# Altium PCB Thunderscope_Rev5.3.PcbDoc (part 11 of 14)
Units mil, origin at the board's own origin, x right, y up, seen from the top; angles counter-clockwise.
Board outline 3937.01 x 3838.58 mil, 6 copper layers (F.Cu, In1.Cu (GND), In2.Cu (Sign), In3.Cu (Sign), In4.Cu (GND), B.Cu), stack 60.556 mil thick; 911 components, 486 nets, 2834 pads, 2761 vias.
Unrouted connection lines stored in the file: 618.
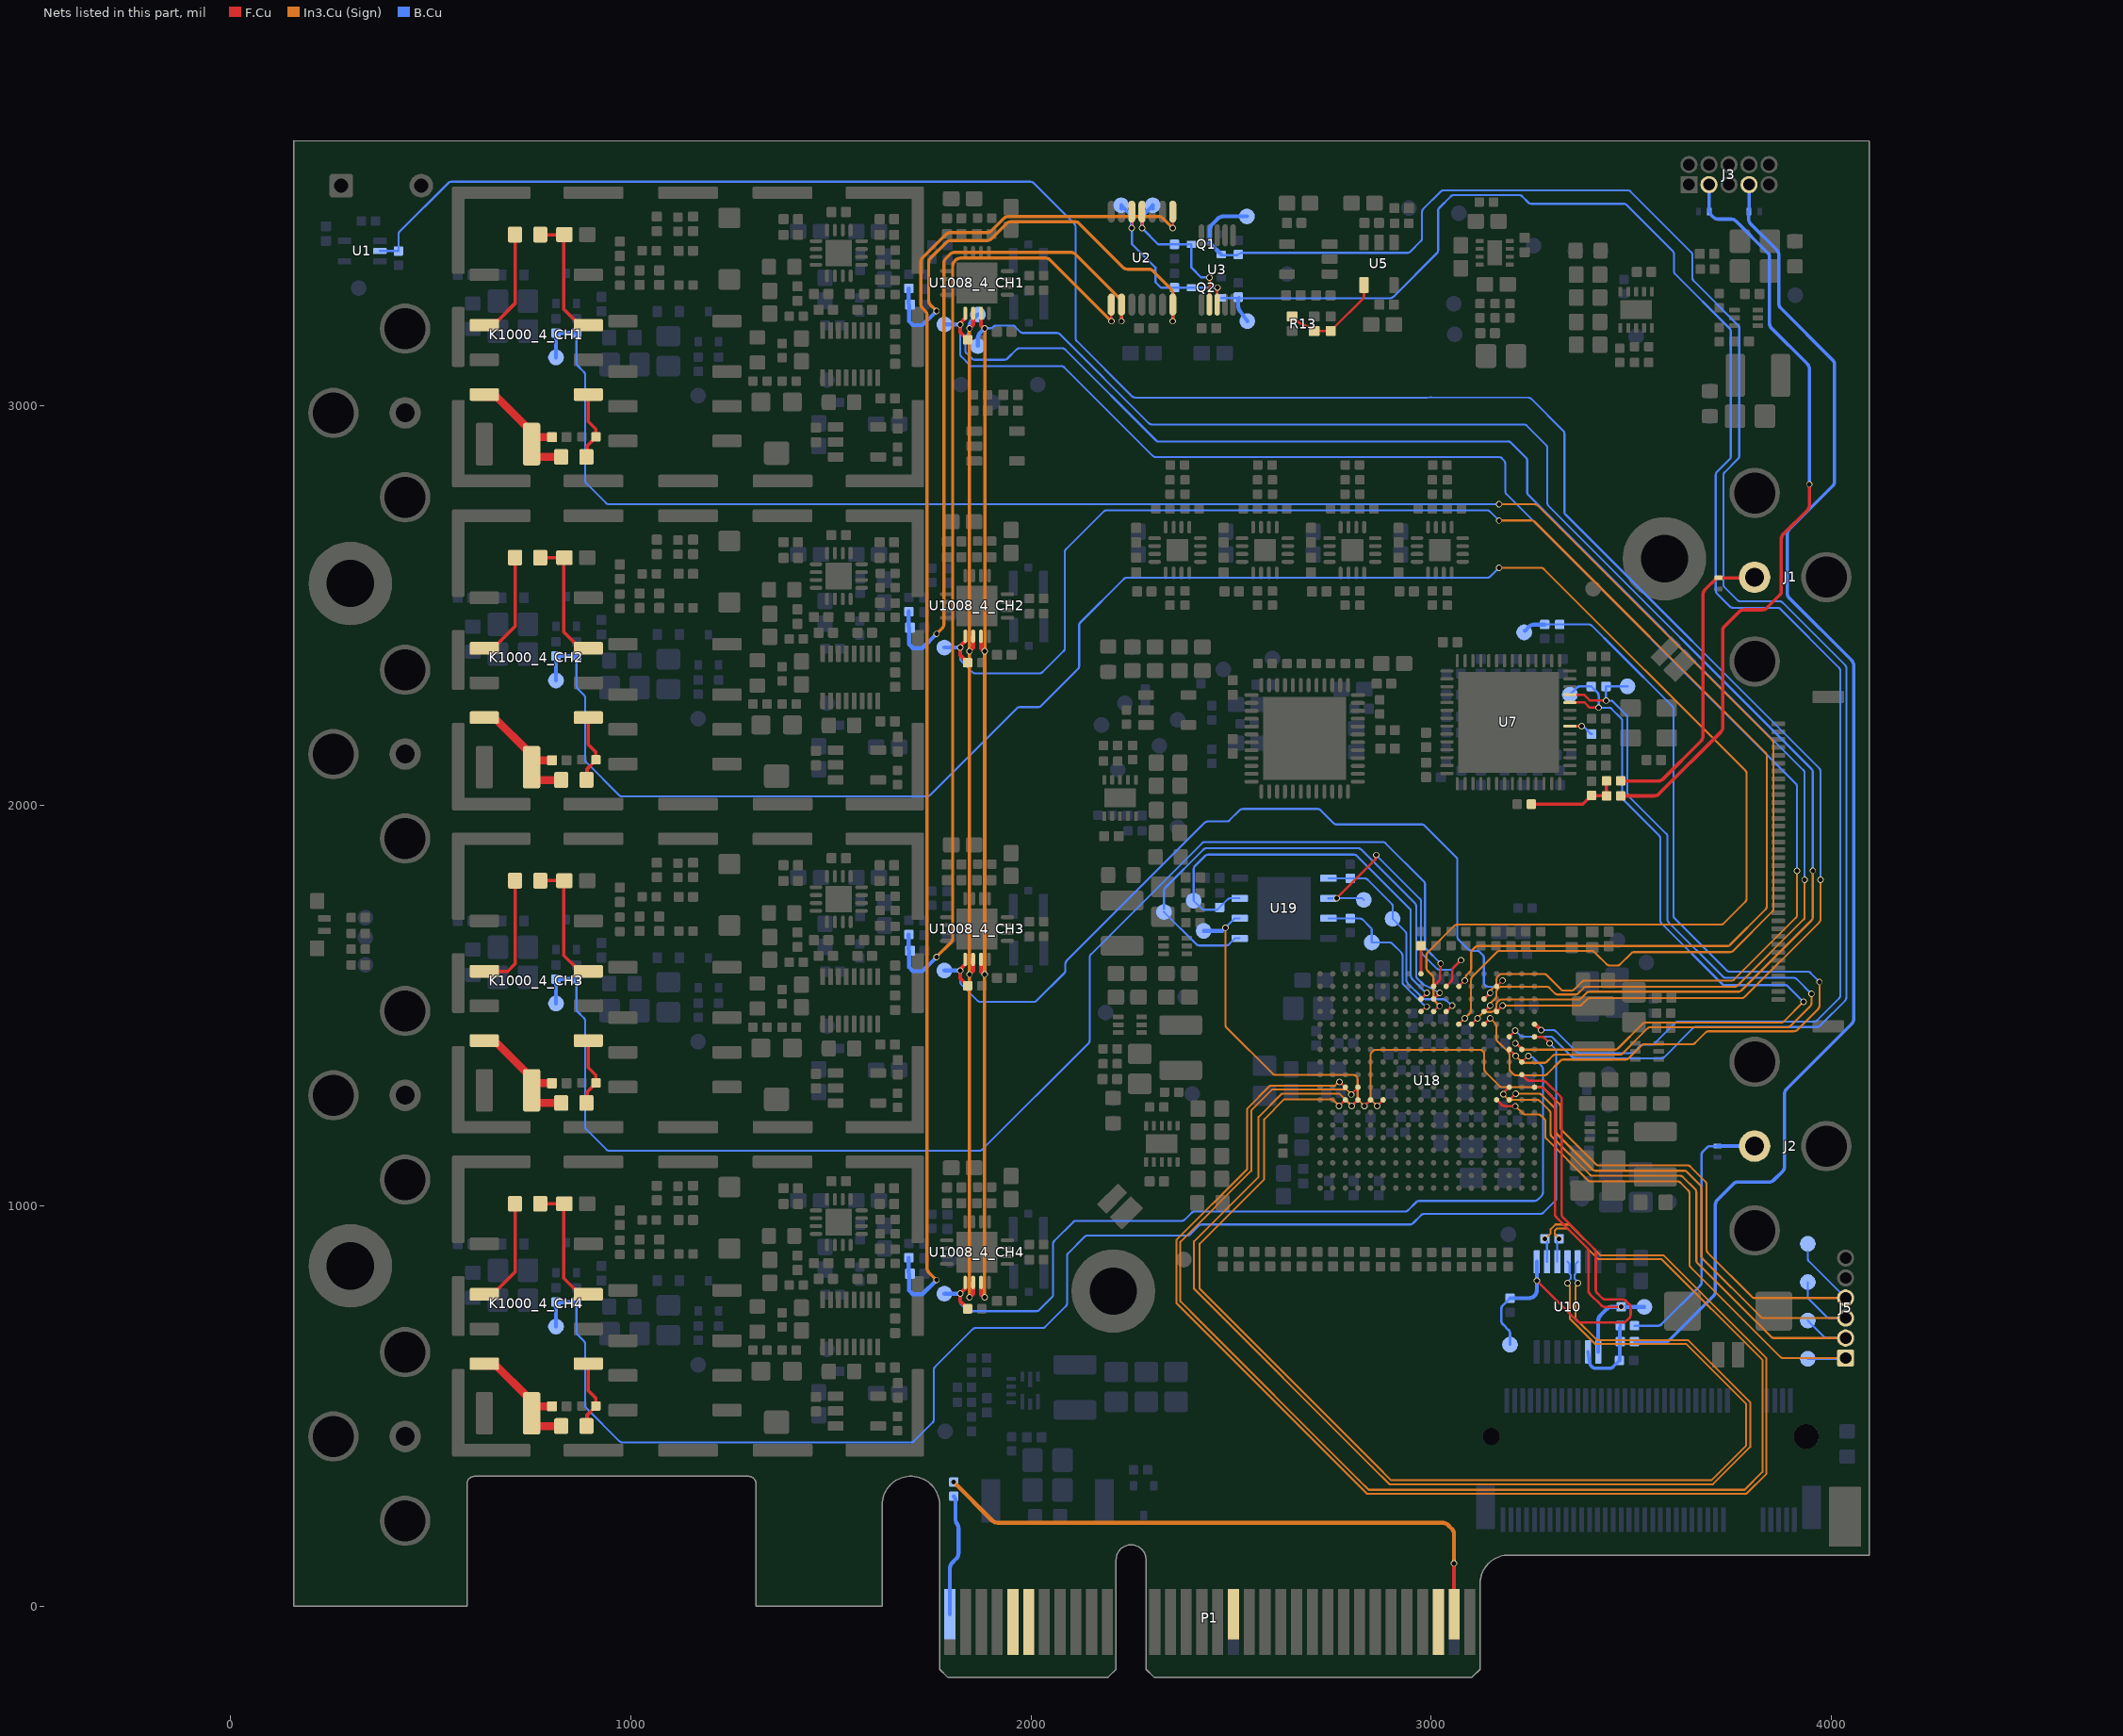
[diagram p14: the nets of this part, all layers, seen from the top]

## Via types
v1: diameter 16, hole 11.81, F.Cu to B.Cu, tented both sides, 2761 vias

## Nets (pads, with @x,y where several pads share a name; then routed paths per layer and width w, separated by ;. In a path a pad name is that pad's centre, name@x,y a point inside that pad or via, vN(x,y) a via of type N, cw(c..) or ccw(c..) an arc to the next point about the centre after c; other vN are vias at no path point) (continued)
PGA_CSn_1: R1033_4_CH1.2 TP1016_4_CH1.1 U18.P16 U1008_4_CH1.9 | length 4013.3
  F.Cu w6: U18.P16@3132.08,1517.14 v1(3147.05,1532.12)
  F.Cu w9.84: v1(1822.83,3202.36) 1824.01,3203.54 1824.01,3206.89 1835.63,3218.5 U1008_4_CH1.9@1835.63,3230.32
  F.Cu w10: v1(1822.83,3202.36) 1822.83,3183.07 R1033_4_CH1.2@1841.53,3164.37
  In3.Cu (Sign) w5: v1(3147.05,1532.12) 3147.05,1532.65 cw(c3157.05,1532.65) 3149.96,1539.71 3160.1,1549.84 ccw(c3153.01,1556.89) 3163.01,1556.89 3163.01,1565.91 cw(c3173.01,1565.91) 3165.94,1572.98 3170.02,1577.06 cw(c3177.07,1569.97) 3177.07,1579.97 3281.04,1579.97 cw(c3281.04,1569.97) 3288.11,1577.04 3324.02,1541.13 ccw(c3331.05,1548.25) 3330.98,1538.25 3350.24,1538.25 ccw(c3350.24,1548.25) 3357.3,1541.16 3376.09,1559.96 cw(c3383.14,1552.86) 3383.14,1562.86 3749.88,1562.86 ccw(c3749.88,1572.86) 3756.94,1565.77 3911.12,1719.96 ccw(c3904.04,1727.01) 3914.04,1727.01 v1(3914.04,1837.63)
  B.Cu w5: v1(1822.83,3202.36) 1822.83,3129.14 ccw(c1832.83,3129.14) 1825.73,3122.1 1846.5,3101.34 ccw(c1853.55,3108.43) 1853.55,3098.43 2075.58,3098.43 cw(c2075.58,3088.43) 2082.64,3095.51 2304.17,2873.98 ccw(c2311.23,2881.06) 2311.23,2871.06 3169.17,2871.06 cw(c3169.17,2861.06) 3176.22,2868.15 3181.88,2862.5 cw(c3174.79,2855.44) 3184.79,2855.44 3184.79,2785.55 ccw(c3194.79,2785.59) 3187.69,2778.55 3911.11,2055.13 cw(c3904.04,2048.06) 3914.04,2048.06 v1(3914.04,1837.63)
  B.Cu w10: TP1016_4_CH1.1@1783.46,3202.36 v1(1822.83,3202.36)
PGA_CSn_2: R1033_4_CH2.2 TP1016_4_CH2.1 U18.M17 U1008_4_CH2.9 | length 4007.3
  F.Cu w6: U18.M17@3069.09,1548.64 v1(3084.06,1563.61)
  F.Cu w9.84: v1(1822.83,2395.28) 1824.01,2396.45 1824.01,2399.8 1835.63,2411.42 U1008_4_CH2.9@1835.63,2423.23
  F.Cu w10: v1(1822.83,2395.28) 1822.83,2375.98 R1033_4_CH2.2@1841.53,2357.28
  In3.Cu (Sign) w5: v1(3084.06,1563.61) 3086.24,1572.88 cw(c3095.97,1570.59) 3088.89,1577.65 3096.82,1585.58 ccw(c3089.73,1592.63) 3099.73,1592.63 3099.73,1632.58 cw(c3109.73,1632.58) 3102.64,1639.63 3109.65,1646.64 cw(c3116.69,1639.54) 3116.69,1649.54 3739.81,1649.54 ccw(c3739.81,1659.54) 3746.86,1652.45 3835.54,1741.13 ccw(c3828.45,1748.18) 3838.45,1748.18 3838.45,2125.08 ccw(c3828.45,2125.08) 3835.54,2132.13 3257.99,2709.69 ccw(c3250.93,2702.6) 3250.93,2712.6 v1(3169.29,2712.6)
  B.Cu w5: v1(1822.83,2395.28) 1822.83,2368.32 ccw(c1832.83,2368.32) 1825.73,2361.28 1853.39,2333.62 ccw(c1860.44,2340.71) 1860.44,2330.71 2021.45,2330.71 ccw(c2021.45,2340.71) 2028.5,2333.62 2081.58,2386.69 ccw(c2074.49,2393.75) 2084.49,2393.75 2084.49,2633.99 cw(c2094.49,2633.99) 2087.4,2641.05 2181.25,2734.9 cw(c2188.29,2727.8) 2188.29,2737.79 3139.95,2737.8 cw(c3139.95,2727.8) 3147.02,2734.87 v1(3169.29,2712.6)
  B.Cu w10: TP1016_4_CH2.1@1783.46,2395.28 v1(1822.83,2395.28)
PGA_CSn_3: R1033_4_CH3.2 TP1016_4_CH3.1 U18.R17 U1008_4_CH3.9 | length 2101.5
  F.Cu w6: U18.R17@3163.58,1548.64 v1(3178.55,1563.61)
  F.Cu w9.84: v1(1822.83,1588.19) 1824.01,1589.37 1824.01,1592.71 1835.63,1604.33 U1008_4_CH3.9@1835.63,1616.14
  F.Cu w10: v1(1822.83,1588.19) 1822.83,1568.9 R1033_4_CH3.2@1841.53,1550.2
  B.Cu w5: v1(1822.83,1588.19) 1822.83,1560.24 ccw(c1832.83,1560.24) 1825.73,1553.2 1866.18,1512.76 ccw(c1873.24,1519.84) 1873.24,1509.84 2006.68,1509.84 ccw(c2006.68,1519.84) 2013.74,1512.76 2083.02,1582.04 ccw(c2075.94,1589.1) 2085.94,1589.1 2085.94,1605.42 cw(c2095.94,1605.42) 2088.85,1612.47 2434.11,1957.73 cw(c2441.15,1950.63) 2441.15,1960.63 2489.16,1960.63 ccw(c2489.16,1970.63) 2496.22,1963.54 2521.9,1989.23 cw(c2528.95,1982.13) 2528.95,1992.13 2716.13,1992.13 cw(c2716.13,1982.13) 2723.18,1989.22 2756.14,1956.26 ccw(c2763.2,1963.35) 2763.2,1953.35 2976.57,1953.35 cw(c2976.57,1943.35) 2983.62,1950.43 3062.38,1871.68 ; 3062.39,1871.67 cw(c3055.31,1864.6) 3065.31,1864.6 3065.31,1672.5 ccw(c3075.31,1672.55) 3068.2,1665.51 ; 3068.24,1665.48 3093.14,1640.57 ccw(c3100.2,1647.66) 3100.2,1637.66 3114.17,1637.66 cw(c3114.17,1627.66) 3121.23,1634.74 3128.64,1627.34 cw(c3121.55,1620.28) 3131.55,1620.28 3131.55,1558.11 ccw(c3141.55,1558.11) 3141.55,1548.11 3158.91,1548.11 ccw(c3158.91,1558.11) 3165.96,1551.02 v1(3178.55,1563.61)
  B.Cu w10: TP1016_4_CH3.1@1783.46,1588.19 v1(1822.83,1588.19)
PGA_CSn_4: R1033_4_CH4.2 TP1016_4_CH4.1 U18.U11 U1008_4_CH4.9 | length 2186.3
  F.Cu w5: U18.U11@3226.43,1358.92 U18.U11@3226.43,1359.61 ; U18.U11@3227.12,1359.61 v1@3241.3,1373.78
  F.Cu w9.84: v1(1822.83,781.1) 1835.63,793.9 U1008_4_CH4.9@1835.63,809.06
  F.Cu w10: v1(1822.83,781.1) 1822.83,761.81 R1033_4_CH4.2@1841.53,743.11
  B.Cu w5: v1(1822.83,781.1) 1822.83,760.05 ccw(c1832.83,760.05) 1825.73,753.01 1838.53,740.21 ccw(c1845.59,747.3) 1845.59,737.3 2013.45,737.3 ccw(c2013.45,747.3) 2020.5,740.21 2052.1,771.81 ccw(c2045.02,778.86) 2055.02,778.86 2055.02,905.45 cw(c2065.02,905.45) 2057.93,912.51 2105.52,960.1 cw(c2112.56,953) 2112.56,963 2377.16,963 ccw(c2377.16,973) 2384.22,965.91 2401.63,983.32 cw(c2408.67,976.22) 2408.67,986.22 2934.83,986.22 ccw(c2934.83,996.22) 2941.89,989.13 2962.65,1009.9 cw(c2969.69,1002.8) 2969.69,1012.8 3258.64,1012.8 ccw(c3258.64,1022.8) 3265.7,1015.71 3276.02,1026.03 ccw(c3268.94,1033.09) 3278.94,1033.09 3278.94,1342.04 ccw(c3268.94,1342.04) 3276.02,1349.09 3256.13,1368.98 ccw(c3249.06,1361.91) 3252.39,1371.34 v1(3242.97,1374.67)
  B.Cu w10: TP1016_4_CH4.1@1783.46,780.51 ccw(c1783.62,790.51) 1783.62,780.51 1818.07,780.51 ccw(c1818.01,800.51) v1(1822.83,781.1)
PGA_SCLK: TP25.1 U18.N14 U1008_4_CH1.11 U1008_4_CH2.11 U1008_4_CH3.11 U1008_4_CH4.11 | length 6588.1
  F.Cu w6: U18.N14@3100.59,1454.15 v1@3115.56,1469.12
  F.Cu w9.84: U1008_4_CH4.11@1875,809.06 1875,778.54 1881.89,771.65 v1(1884.25,771.65) ; U1008_4_CH3.11@1875,1616.14 1875,1585.63 v1@1881.89,1578.74 ; U1008_4_CH2.11@1875,2423.23 1875,2392.72 v1@1881.89,2385.83 ; U1008_4_CH1.11@1875,3230.32 1875,3199.8 v1@1881.89,3192.91
  In3.Cu (Sign) w5: v1(3115.56,1469.16) 3116.32,1469.89 ccw(c3109.37,1477.08) 3116.45,1470.01 3128.19,1481.75 cw(c3135.24,1474.66) 3135.24,1484.66 3148.93,1484.66 ccw(c3148.93,1494.66) 3156,1487.59 3160.09,1491.69 ccw(c3153.01,1498.74) 3163.01,1498.74 3163.01,1502.91 cw(c3173.01,1502.91) 3165.92,1509.97 3169.21,1513.26 cw(c3176.25,1506.16) 3176.25,1516.16 3367.52,1516.16 ccw(c3367.52,1526.16) 3374.58,1519.07 3387.91,1532.4 cw(c3394.95,1525.3) 3394.95,1535.3 3767.82,1535.3 ccw(c3767.82,1545.3) 3774.88,1538.21 3950.51,1713.84 ccw(c3943.42,1720.9) 3953.42,1720.9 v1(3953.42,1837.74)
  In3.Cu (Sign) w8: v1@1883.78,772.12 v1@1883.78,1576.11 ; v1(1884.25,2385.83) ccw(c1868.65,2389.35) 1884.65,2389.35 1884.65,3189.44 ccw(c1868.65,3189.39) v1(1884.25,3192.91)
  In3.Cu (Sign) w8.65: 1884.25,1849.05 1884.25,1858.83
  In3.Cu (Sign) w10: v1@1884.04,2382.25 v1(1884.25,2385.83) 1884.25,2383.96 v1@1884.25,2379.12 ; v1@1884.25,1576.58 1884.25,1849.05 ; 1884.25,1858.83 v1@1884.25,2379.12
  B.Cu w5: v1(1884.25,3192.91) 1897.76,3192.91 ccw(c1897.76,3202.91) 1904.81,3195.83 1905.64,3196.66 cw(c1912.68,3189.56) 1912.68,3199.56 1953.46,3199.56 cw(c1953.46,3189.56) 1960.51,3196.64 1973.16,3184 ccw(c1980.2,3191.1) 1980.2,3181.1 2064.74,3181.1 cw(c2064.74,3171.1) 2071.79,3178.19 2294.52,2955.47 ccw(c2301.54,2962.58) 2301.54,2952.58 3231.27,2952.58 cw(c3231.27,2942.58) 3238.32,2949.67 3287.26,2900.73 cw(c3280.18,2893.66) 3290.18,2893.66 3290.18,2756 ccw(c3300.18,2756.04) 3293.08,2749 ; 3293.11,2748.97 3950.51,2091.58 cw(c3943.42,2084.52) 3953.42,2084.52 v1(3953.42,1837.74)
  B.Cu w10: TP25.1@1867.13,3148.62 1867.13,3167.5 cw(c1887.13,3167.5) 1872.95,3181.61 v1(1884.25,3192.91)
  other v1: 1884.25,1578.74
PGA_SDIO: TP42.1 U18.P15 U1008_4_CH1.10 U1008_4_CH2.10 U1008_4_CH3.10 U1008_4_CH4.10 | length 6582
  F.Cu w6: U18.P15@3132.08,1485.65 v1(3147.05,1500.62)
  F.Cu w10: v1(1846.06,771.65) 1855.31,780.91 U1008_4_CH4.10@1855.31,809.06 ; v1(1846.06,1578.74) 1855.31,1587.99 U1008_4_CH3.10@1855.31,1616.14 ; v1(1846.06,2385.83) 1855.31,2395.08 U1008_4_CH2.10@1855.31,2423.23 ; v1(1846.06,3192.91) 1855.31,3202.17 U1008_4_CH1.10@1855.31,3230.32
  In3.Cu (Sign) w5: v1(3147.05,1500.62) 3147.05,1501.15 cw(c3157.05,1501.15) 3149.96,1508.21 3160.1,1518.34 ccw(c3153.01,1525.4) 3163.01,1525.4 3163.01,1534.41 cw(c3173.01,1534.41) 3165.92,1541.46 3169.63,1545.17 cw(c3176.67,1538.07) 3176.67,1548.07 3288.05,1548.07 cw(c3288.05,1538.07) 3295.12,1545.14 3309.17,1531.09 ccw(c3316.2,1538.21) 3316.14,1528.21 3359.89,1528.21 ccw(c3359.89,1538.21) 3366.95,1531.12 3380.99,1545.17 cw(c3388.04,1538.07) 3388.04,1548.07 3758.62,1548.07 ccw(c3758.62,1558.07) 3765.68,1550.99 3930.16,1715.46 ccw(c3923.07,1722.52) 3933.07,1722.52 v1(3933.07,1814.96)
  In3.Cu (Sign) w8: v1(1846.06,771.65) v1(1846.06,3192.91)
  B.Cu w5: v1(1846.06,3192.91) cw(c1836.06,3192.91) 1845.39,3189.31 1836.3,3165.8 ccw(c1845.63,3162.2) 1835.63,3162.2 1835.63,3138 ccw(c1845.63,3138) 1838.53,3130.96 1852.4,3117.09 ccw(c1859.46,3124.17) 1859.46,3114.17 1933.85,3114.17 ccw(c1933.85,3124.17) 1940.91,3117.09 1963.86,3140.05 cw(c1970.9,3132.94) 1970.9,3142.94 2078.1,3142.94 cw(c2078.1,3132.94) 2085.17,3140.01 2312.86,2912.33 ccw(c2319.9,2919.43) 2319.84,2909.43 3191.75,2910.39 cw(c3191.76,2900.39) 3198.84,2907.46 3236.92,2869.38 cw(c3229.85,2862.31) 3239.85,2862.31 3239.85,2783.03 ccw(c3249.85,2783.08) 3242.75,2776.04 ; 3242.78,2776.01 3930.16,2088.63 cw(c3923.07,2081.57) 3933.07,2081.57 v1(3933.07,1814.96)
  B.Cu w10: v1(1846.06,3192.91) 1846.06,3198.01 cw(c1866.06,3198.01) 1851.92,3212.16 TP42.1@1867.13,3227.36
PLL_RSTn: R44.1 R45.2 TP18.1 U18.P14 | length 2496.4
  F.Cu w6: U18.P14@3132.08,1454.15 v1(3147.05,1469.12)
  In3.Cu (Sign) w5: v1(3147.05,1469.12) 3159.94,1456.23 cw(c3152.87,1449.16) 3162.87,1449.16 3162.87,1418.21 ccw(c3172.87,1418.21) 3165.79,1411.15 3192.43,1384.51 cw(c3185.33,1377.47) 3195.33,1377.47 3195.33,1343.35 ccw(c3205.33,1343.35) 3198.25,1336.29 3205.18,1329.36 ccw(c3212.23,1336.45) 3212.23,1326.45 3282.15,1326.45 ccw(c3282.15,1336.45) 3289.22,1329.38 3322.93,1363.09 cw(c3329.99,1356.01) 3329.99,1366.01 3486.07,1366.01 ccw(c3486.07,1376.01) 3493.13,1368.92 3525.37,1401.16 cw(c3532.41,1394.06) 3532.41,1404.06 3651.89,1404.06 ccw(c3651.89,1414.06) 3658.94,1406.97 3685.72,1433.75 cw(c3692.76,1426.65) 3692.76,1436.65 3907.13,1436.65 ccw(c3907.13,1446.65) 3914.18,1439.56 3967.09,1492.46 ccw(c3960,1499.52) 3970,1499.52 v1(3970,1560)
  B.Cu w5: R45.2@3283.46,2452.76 3312.01,2452.76 R44.1@3320.87,2452.76 3329.72,2452.76 3394.48,2452.76 cw(c3394.48,2442.76) 3401.55,2449.83 3460.74,2390.64 3602.36,2249.02 cw(c3595.29,2241.94) 3605.29,2241.94 3605.29,1725.6 ccw(c3615.29,1725.64) 3608.19,1718.6 3738.4,1588.39 ccw(c3745.43,1595.5) 3745.43,1585.5 3940.35,1585.5 cw(c3940.35,1575.5) 3947.42,1582.58 v1(3970,1560)
  B.Cu w10: TP18.1@3234.25,2437.01 3244.17,2446.93 cw(c3258.28,2432.76) 3258.28,2452.76 R45.2@3283.46,2452.76
PLL_SCL: R46.1 TP17.1 U7.24 U18.U12 | length 2049.9
  F.Cu w6: v1(3210.3,1406.4) 3210.69,1406.4 3210.73,1406.36 3212.65,1406.36 3226.43,1392.58 U18.U12@3226.43,1391.1 ; U7.24@3346.46,2257.87 3383.56,2257.87 3396.35,2245.08 v1(3418.31,2245.08)
  In3.Cu (Sign) w5: v1(3210.3,1406.4) 3210.37,1406.38 cw(c3208.26,1396.61) 3215.33,1403.68 3225.5,1393.51 ccw(c3232.56,1400.6) 3232.56,1390.6 3459.29,1390.6 ccw(c3459.29,1400.6) 3466.35,1393.52 3528.33,1455.31 cw(c3535.37,1448.2) 3535.37,1458.2 3874.06,1458.2 ccw(c3874.06,1468.2) 3881.11,1461.11 v1(3930,1510)
  B.Cu w5: v1(3418.31,2245.08) 3443.83,2245.08 cw(c3443.83,2235.08) 3450.89,2242.17 3474.11,2218.94 cw(c3467.02,2211.89) 3477.02,2211.89 3477.02,2022.12 ccw(c3487.02,2022.12) 3479.94,2015.07 3569.43,1925.58 cw(c3562.34,1918.52) 3572.34,1918.52 3572.34,1713.28 ccw(c3582.34,1713.28) 3575.24,1706.24 3726.61,1554.87 ccw(c3733.66,1561.96) 3733.66,1551.96 3883.9,1551.96 cw(c3883.9,1541.96) 3890.96,1549.04 v1(3930,1510)
  B.Cu w6: TP17.1@3346.46,2277.56 3363.65,2294.75 cw(c3372.1,2286.23) 3372.1,2298.23 R46.1@3399.61,2298.23 3408.42,2289.42 3414.79,2283.04 cw(c3406.31,2274.56) 3418.31,2274.56 v1(3418.31,2245.08)
PLL_SDA: R47.1 TP16.1 U7.25 U18.T12 | length 2094
  F.Cu w6: U18.T12@3194.94,1391.1 3210.59,1375.46 3210.69,1375.46 v1(3211.08,1375.06) ; U7.25@3346.46,2277.56 3381.89,2277.56 3396.65,2262.8 v1(3437.01,2262.8)
  In3.Cu (Sign) w5: v1(3211.08,1375.06) ccw(c3218.93,1381.25) 3211.83,1374.21 3225.6,1360.44 ccw(c3232.65,1367.53) 3232.65,1357.53 3281.73,1357.53 ccw(c3281.73,1367.53) 3288.78,1360.44 3303.26,1374.92 cw(c3310.3,1367.82) 3310.3,1377.82 3470.32,1377.82 ccw(c3470.32,1387.82) 3477.38,1380.73 3540.4,1443.75 cw(c3547.44,1436.65) 3547.44,1446.65 3890.22,1446.65 ccw(c3890.22,1456.65) 3897.27,1449.56 3947.09,1499.38 ccw(c3940,1506.43) 3950,1506.43 v1(3950,1530)
  B.Cu w5: v1(3437.01,2262.8) 3447.17,2262.8 cw(c3447.17,2252.8) 3454.24,2259.87 3487.48,2226.63 cw(c3480.41,2219.56) 3490.41,2219.56 3490.41,2031.12 ccw(c3500.41,2031.12) 3493.36,2024.03 3587.49,1929.9 cw(c3580.4,1922.85) 3590.4,1922.85 3590.4,1715.54 ccw(c3600.4,1715.54) 3593.29,1708.5 3729.06,1572.74 ccw(c3736.09,1579.85) 3736.09,1569.85 3906.01,1569.85 cw(c3906.01,1559.85) 3913.08,1566.92 v1(3950,1530)
  B.Cu w6: v1(3437.01,2262.8) R47.1@3437.01,2298.23 3445.82,2298.23 TP16.1@3490.16,2298.23
PROBE_COMP: R8.1 U1.2 U18.R15 | length 5866.5
  F.Cu w6: U18.R15@3163.58,1485.65 v1(3178.55,1500.62)
  In3.Cu (Sign) w5: v1(3178.55,1500.62) 3369.7,1500.62 ccw(c3369.7,1510.62) 3376.77,1503.55 3390,1516.77 cw(c3397.05,1509.69) 3397.05,1519.69 3776.25,1519.69 ccw(c3776.25,1529.69) 3783.31,1522.6 3969.53,1708.82 ccw(c3962.44,1715.87) 3972.44,1715.87 v1(3972.44,1814.96)
  B.Cu w5: R8.1@419.29,3387.79 419.29,3426.96 cw(c429.29,3426.96) 422.2,3434.02 544.35,3556.16 cw(c551.39,3549.06) 551.39,3559.06 1998.81,3559.06 cw(c1998.81,3549.06) 2005.86,3556.15 2108.26,3453.75 cw(c2101.17,3446.7) 2111.17,3446.7 2111.17,3168.31 ccw(c2121.17,3168.31) 2114.07,3161.27 2252.76,3022.57 ccw(c2259.79,3029.68) 2259.79,3019.68 2989.17,3019.68 ccw(c2989.13,3029.68) 2990.03,3019.73 2998.16,3020.46 cw(c2999.55,3005.02) 2999.66,3020.52 3243.06,3019.48 cw(c3243.02,3009.48) 3250.09,3016.55 3329.87,2936.76 cw(c3322.8,2929.69) 3332.8,2929.69 3332.8,2734.27 ccw(c3342.8,2734.33) 3335.7,2727.29 3969.51,2093.48 cw(c3962.44,2086.41) 3972.44,2086.45 ; v1(3972.44,1814.96) 3972.44,2086.41
  B.Cu w6: U1.2@373.03,3385.83 410.48,3385.83 R8.1@419.29,3385.83
PRSNT1#: P1.A1 R41.1 | length 304.2
  B.Cu w10: P1.A1@1797.24,-19.69 1797.24,94.56 cw(c1817.24,94.56) 1803.07,108.67 1812.82,118.42 ccw(c1798.68,132.56) 1818.68,132.56 1818.68,194.81 ccw(c1798.68,194.69) 1815.32,205.79 1814.67,206.77 cw(c1831.31,217.87) 1811.31,217.84 1811.31,267.8 R41.1@1807.09,274.61
PRSNT2#_1: P1.B17
PRSNT2#_4: P1.B31 R41.2 | length 1505.6
  F.Cu w10: P1.B31@3057.09,-19.69 v1(3057.09,107.28)
  In3.Cu (Sign) w10: v1(1807.09,310.04) 1902.64,214.49 ccw(c1916.75,228.66) 1916.75,208.66 3028.13,208.66 cw(c3028.13,188.66) 3042.24,202.84 3051.26,193.82 cw(c3037.09,179.71) 3057.09,179.71 v1(3057.09,107.28)
PUDC: R112.1 U18.J18 | length 70.4
  F.Cu w6: U18.J18@2974.41,1580.22 R112.1@2974.41,1650.59
PWRBRK#: P1.B30
QSPI_CLK: TP43.1 U18.E8 U19.6 | length 830.9
  F.Cu w6: v1@2833.38,1249.47 2833.38,1250.09 U18.E8@2848.35,1265.06
  In3.Cu (Sign) w5: v1(2485.83,1695.28) 2485.83,1452.37 ccw(c2495.83,1452.37) 2488.72,1445.33 2603.87,1330.18 ccw(c2610.93,1337.27) 2610.93,1327.27 2805.46,1327.27 cw(c2805.46,1317.27) 2812.53,1324.34 2813.06,1323.81 cw(c2805.99,1316.74) 2815.99,1316.74 2815.99,1271.62 ccw(c2825.99,1271.62) 2818.77,1264.7 2833.23,1249.62 cw(c2827.82,1244.42) v1@2833.37,1249.47
  B.Cu w5: v1(2485.83,1695.28) 2509.45,1718.9 2521.06,1718.9 U19.6@2521.26,1718.7
  B.Cu w10: TP43.1@2431.5,1687.4 2477.95,1687.4 v1(2485.83,1695.28)
  other v1: 2833.13,1249.47
QSPI_CS: R67.1 TP53.1 U18.L15 U19.1 | length 551.6
  F.Cu w6: U18.L15@3037.59,1485.65 v1@3052.56,1500.62
  B.Cu w5: U19.1@2743.31,1818.7 2761.48,1818.5 2833.85,1818.5 cw(c2833.85,1808.5) 2840.9,1815.59 2900.63,1755.87 cw(c2893.54,1748.81) 2903.54,1748.81 TP53.1@2903.54,1717.52 2935.22,1685.84 cw(c2928.15,1678.77) 2938.15,1678.77 2938.15,1563.99 ccw(c2948.15,1563.99) 2941.05,1556.95 2978.49,1519.5 ccw(c2985.52,1526.62) 2985.52,1516.62 3029.48,1516.62 cw(c3029.48,1506.62) 3035.81,1514.36 v1(3052.56,1500.65)
QSPI_DQ0: TP47.1 U18.K16 U19.5 | length 1282.3
  F.Cu w6: U18.K16@3006.1,1517.14 v1(3021.07,1532.12)
  B.Cu w5: TP47.1@2332.28,1734.65 2413.12,1653.81 ccw(c2420.19,1660.88) 2420.19,1650.88 2487.68,1650.88 ccw(c2487.68,1660.88) 2494.75,1653.81 2503.29,1662.34 2509.65,1668.7 U19.5@2521.26,1668.7 ; TP47.1@2332.28,1742.52 2332.28,1787.79 cw(c2342.28,1787.79) 2335.2,1794.84 2431.16,1890.8 cw(c2438.2,1883.7) 2438.2,1893.7 2817.71,1893.7 cw(c2817.71,1883.7) 2824.78,1890.77 2959.28,1756.27 cw(c2952.21,1749.2) 2962.21,1749.21 2962.21,1575.67 ccw(c2972.21,1575.68) 2965.11,1568.64 2979.01,1554.74 ccw(c2989.94,1565.73) 2983.58,1551.59 2995.39,1546.29 cw(c2989.03,1532.15) 2996.55,1545.71 v1(3021.07,1532.12)
QSPI_DQ1: TP46.1 U18.L17 U19.2 | length 735.1
  F.Cu w6: v1(2763.98,1768.7) 2860.39,1865.11 2860.39,1874.96 v1(2862.3,1876.87) ; U18.L17@3037.59,1548.64 3049.07,1560.12 ccw(c3040.56,1568.58) 3052.56,1568.58 3052.56,1587.56 cw(c3064.56,1587.56) 3056.08,1596.04 3072.23,1612.19 cw(c3080.68,1603.68) v1(3074.66,1614.06)
  B.Cu w5: v1(2763.98,1768.7) 2827.65,1768.7 TP46.1@2831.58,1764.76 ; v1(2862.3,1876.87) 2971.57,1767.6 cw(c2964.5,1760.53) 2974.5,1760.53 2974.5,1636.87 ccw(c2984.5,1636.87) 2977.4,1629.83 3013.93,1593.3 ccw(c3020.96,1600.42) 3020.96,1590.42 3046.88,1590.42 ccw(c3046.88,1600.42) 3053.93,1593.33 v1(3074.66,1614.06)
  B.Cu w6: U19.2@2743.31,1768.7 v1(2763.98,1768.7)
QSPI_DQ2: R66.2 TP48.1 U18.J15 U19.3 | length 417.7
  F.Cu w6: U18.J15@2974.47,1485.59 2974.51,1485.63 2986.77,1497.9 v1(2989.03,1497.9)
  B.Cu w5: U19.3@2743.31,1718.7 2761.48,1718.11 2822.04,1718.11 cw(c2822.04,1708.11) 2829.09,1715.2 2848.46,1695.83 cw(c2841.38,1688.77) 2851.38,1688.77 TP48.1@2851.38,1658.46 2895.46,1658.46 cw(c2895.46,1648.46) 2902.52,1655.55 2925.24,1632.83 cw(c2918.15,1625.78) 2928.15,1625.78 2928.15,1559.94 ccw(c2938.15,1559.94) 2930.96,1552.99 2933.77,1550.09 ccw(c2948.15,1563.99) 2934,1549.85 2971.41,1512.44 2983.23,1500.72 ccw(c2990.28,1507.82) v1(2989.03,1497.9)
QSPI_DQ3: R68.2 TP52.1 U18.J16 U19.7 | length 1075.2
  F.Cu w6: U18.J16@2974.6,1517.14 2989.03,1531.58 v1(2989.03,1532.15)
  B.Cu w5: U19.7@2521.26,1768.7 2498.24,1768.7 ccw(c2498.24,1758.7) 2491.2,1765.8 2465.55,1740.16 2433.28,1740.16 cw(c2433.28,1750.16) 2426.22,1743.07 TP52.1@2406.5,1762.8 2406.5,1842.12 cw(c2416.5,1842.12) 2409.41,1849.17 2435.29,1875.05 cw(c2442.33,1867.95) 2442.33,1877.95 2806.88,1877.95 cw(c2806.88,1867.95) 2813.95,1875.02 2945.98,1743 cw(c2938.91,1735.92) 2948.91,1735.93 2948.91,1574.83 ccw(c2958.91,1574.83) 2951.82,1567.78 2985.04,1534.56 ccw(c2992.07,1541.68) v1(2989.03,1532.15)
REFINOUT: C64.1 R4.1 R5.1 R43.2 | length 234.8
  F.Cu w8: R43.2@3250,2003.94 3378.94,2003.94 C64.1@3400.59,2025.59 3437.01,2025.59 R5.1@3437.99,2024.61 R4.1@3437.99,2062.01
REFINOUT1: D2.1 J1.1 R4.2 | length 733
  F.Cu w8.39: R4.2@3473.43,2062.01 3567.66,2062.01 ccw(c3567.66,2078.78) 3579.5,2066.9 3674.02,2161.42 ccw(c3662.14,2173.26) 3678.91,2173.26 3678.91,2527.46 cw(c3695.68,2527.41) 3683.8,2539.25 3713.74,2569.19 3775.57,2569.19 3777.25,2570.87 J1.1@3779.53,2570.87 ; J1.1@3805.39,2570.87 J1.1@3808.07,2570.87
REFINOUT2: D4.1 J3.3 R5.2 | length 1932.1
  F.Cu w8.39: R5.2@3473.43,2024.61 3557.26,2024.61 ccw(c3557.26,2041.38) 3569.1,2029.49 3723.25,2183.65 ccw(c3711.37,2195.49) 3728.14,2195.49 3728.14,2436.44 cw(c3744.91,2436.44) 3733.04,2448.28 3769.47,2484.71 cw(c3781.31,2472.84) 3781.31,2489.61 3827.47,2489.61 ccw(c3827.47,2506.38) 3839.32,2494.5 3869.95,2525.14 ccw(c3858.07,2536.98) 3874.85,2536.98 3874.85,2666.55 cw(c3891.62,2666.55) 3879.74,2678.39 3939.99,2738.64 ccw(c3928.11,2750.48) 3944.88,2750.48 v1(3944.88,2803.15)
  B.Cu w8.39: J3.3@3694.09,3551.77 3694.09,3489.9 D4.1@3694.88,3484.25 3696.59,3478.6 3704.75,3470.45 ccw(c3716.59,3482.32) 3716.59,3465.55 3749.71,3465.55 cw(c3749.71,3448.78) 3761.56,3460.66 3840.5,3381.71 cw(c3828.64,3369.85) 3845.41,3369.85 3845.41,3204.84 ccw(c3862.18,3204.84) 3850.28,3193.02 3850.32,3192.98 3939.99,3103.32 cw(c3928.11,3091.48) 3944.88,3091.48 v1(3944.88,2803.15)
SMCLK: P1.B5
SMDAT: P1.B6
SYNC: R2.1 R3.1 R63.1 U10.2 | length 203.2
  B.Cu w8.39: U10.2@3391.73,635.33 3395.41,610.49 3395.68,608.71 ccw(c3412.26,611.19) 3412.26,594.42 3443.77,594.42 ccw(c3443.77,611.19) 3455.61,599.31 R63.1@3470.47,614.17
  B.Cu w10: R63.1@3470.47,614.17 3471.46,620.98 3471.46,693.98 R2.1@3472.44,700.79
SYNC1: D3.1 J2.1 R2.2 | length 676.2
  B.Cu w6: R2.2@3507.87,700.79 3566.57,700.79 ccw(c3566.57,712.79) 3575.03,704.28 3672.11,801.36 ccw(c3663.6,809.82) 3675.6,809.82 3675.6,1127.95 cw(c3687.6,1127.95) 3679.09,1136.42 3688.84,1146.17 cw(c3697.29,1137.65) 3697.29,1149.65 D3.1@3715.44,1149.65
  B.Cu w10: D3.1@3715.44,1149.65 3720.28,1149.63 3807.27,1149.63 cw(c3807.19,1129.63) J2.1@3808.07,1149.61
SYNC2: D5.1 J3.7 R3.2 | length 3415.3
  B.Cu w8.39: R3.2@3507.91,661.46 3515.49,660.42 3583.47,660.42 ccw(c3583.47,677.19) 3595.31,665.31 3705.1,775.1 ccw(c3693.23,786.95) 3710,786.95 3710,1003.05 cw(c3726.77,1003.05) 3714.9,1014.9 3755.1,1055.1 cw(c3766.95,1043.23) 3766.95,1060 3844.41,1060 ccw(c3844.41,1076.77) 3856.25,1064.9 3877.81,1086.45 ccw(c3865.95,1098.31) 3882.72,1098.31 3882.72,1280.11 cw(c3899.49,1280.11) 3887.63,1291.97 4050.81,1455.14 ccw(c4038.93,1466.99) 4055.7,1466.99 4055.7,2350.92 ccw(c4038.93,2350.92) 4050.79,2362.78 3894.51,2519.06 cw(c3906.42,2530.87) 3889.65,2530.87 3889.65,2678.69 cw(c3906.42,2678.69) 3894.55,2690.54 4002.98,2798.97 ccw(c3991.1,2810.81) 4007.87,2810.81 4007.87,3101.81 ccw(c3991.1,3101.81) 4002.96,3113.67 3873.37,3243.27 cw(c3885.28,3255.08) 3868.5,3255.08 3868.5,3376.52 ccw(c3851.73,3376.52) 3863.59,3388.38 3798.23,3453.74 cw(c3810.08,3465.61) 3793.31,3465.61 D5.1@3793.31,3484.25 3794.09,3489.9 J3.7@3794.09,3551.77
SYNC_DE: R62.1 TP54.1 U10.1 U18.V9 | length 884.5
  F.Cu w6: U18.V9@3257.93,1296.62 3273.22,1296.62 cw(c3273.22,1284.62) 3281.66,1293.14 3305.57,1269.23 cw(c3297.09,1260.74) 3309.09,1260.74 3309.09,980.52 ccw(c3321.09,980.52) 3312.6,972.03 3389.41,895.22 cw(c3380.91,886.76) 3392.91,886.76 3392.91,788.77 ccw(c3404.91,788.77) 3396.38,780.32 3425.19,751.51 ccw(c3433.64,760.03) 3433.64,748.03 v1(3474.41,748.03)
  B.Cu w10: U10.1@3417.32,635.33 3417.32,713.29 cw(c3437.32,713.29) 3423.15,727.4 3437.95,742.21 cw(c3452.06,728.03) 3452.06,748.03 v1(3474.41,748.03) 3481.22,748.03 TP54.1@3532.48,748.03
SYNC_IN_N: U10.11 U18.C8 | length 3110.5
  F.Cu w5: v1(2769.74,1249.86) 2785,1265.12 U18.C8@2785.49,1265.12
  In3.Cu (Sign) w5: v1(2769.74,1249.86) 2752.96,1266.65 2632.79,1266.65 2582.68,1216.54 2582.68,1066.93 2421.26,905.51 2421.26,793.04 2862.45,351.85 2899.51,314.79 3699.79,314.79 3787,402 3787,505.6 3637.48,655.12 3409.88,655.12 3346.44,718.56 3346.44,798.71 3340.68,804.48 v1(3340.68,807.45)
  B.Cu w5: U10.11@3340.55,860.73 3345.92,855.35 3345.92,830.76 3348.35,828.34 3348.35,818.1 3340.68,810.43 v1(3340.68,807.45)
SYNC_IN_P: U10.12 U18.D8 | length 3204.3
  F.Cu w5: v1(2801.24,1249.86) 2816.49,1265.12 U18.D8@2816.99,1265.12
  In3.Cu (Sign) w5: v1(2801.24,1249.86) 2770.4,1280.71 2626.97,1280.71 2568.62,1222.36 2568.62,1072.75 2407.2,911.33 2407.2,792.95 2852.45,347.71 2895.37,304.79 3703.93,304.79 3797,397.86 3797,509.74 3641.62,665.12 3414.02,665.12 3360.5,718.64 3360.5,798.71 3366.27,804.48 v1(3366.27,807.45)
  B.Cu w5: U10.12@3366.14,860.73 3360.77,855.35 3360.77,830.76 3358.35,828.34 3358.35,818.35 3366.27,810.43 v1(3366.27,807.45)
SYNC_OUT_N: R60.1 U10.9 U18.C9 | length 3591.2
  F.Cu w5: v1(2770.92,1309.71) 2771.32,1310.1 2771.51,1310.1 2785,1296.62 U18.C9@2785.49,1296.62
  In3.Cu (Sign) w5: v1(2770.92,1309.71) 2768.57,1309.71 2759.56,1300.71 2597.81,1300.71 2540.29,1243.18 2540.29,1092.06 2363.03,914.8 2363.03,757.74 2389.16,731.61 2389.16,731.27 2815.47,304.96 2839.42,281.02 3787.28,281.02 3837.54,331.28 3837.54,619.74 3580.18,877.11 3422.11,877.11 3345.41,953.81 3310.24,953.81 3298.52,942.09 3298.52,931.09 3285.74,918.31 v1(3284.32,918.31)
  B.Cu w5: R60.1@3284.45,918.31 3289.37,913.35 U10.9@3289.37,860.73
SYNC_OUT_P: R60.2 U10.10 U18.D9 | length 3536.2
  F.Cu w5: v1@2801.73,1280.87 2801.93,1280.87 2816.99,1295.93 U18.D9@2816.99,1296.62
  In3.Cu (Sign) w5: v1@2798.58,1280.87 2788.74,1290.71 2601.96,1290.71 2550.29,1239.04 2550.29,1087.91 2373.03,910.66 2373.03,761.89 2399.16,735.75 2399.16,735.41 2819.62,314.96 2843.56,291.02 3783.14,291.02 3827.54,335.42 3827.54,615.6 3576.03,867.11 3417.96,867.11 3341.26,943.81 3314.38,943.81 3308.52,937.95 3308.52,929.67 v1(3319.88,918.31)
  B.Cu w5: U10.10@3314.96,860.73 3314.96,913.39 v1(3319.88,918.31)
  other v1: 2800.1,1278.62
SYNC_REn: R61.2 TP55.1 U10.8 U18.U10 | length 1332.4
  F.Cu w6: U18.U10@3226.43,1328.11 3238.59,1315.95 ccw(c3247.05,1324.46) 3247.05,1312.46 3279.02,1312.46 cw(c3279.02,1300.46) 3287.49,1308.97 3322.44,1274.02 cw(c3313.96,1265.53) 3325.96,1265.53 3325.96,979.21 ccw(c3337.96,979.21) 3329.47,970.72 3407.63,892.56 cw(c3399.12,884.1) 3411.12,884.1 3411.12,790.7 ccw(c3423.12,790.7) 3414.6,782.25 3427.11,769.74 ccw(c3435.56,778.26) 3435.56,766.26 3478.28,766.26 cw(c3478.28,754.26) 3486.74,762.77 3494.83,754.67 cw(c3486.32,746.21) 3498.32,746.21 3498.32,728.47 cw(c3486.32,728.47) 3494.83,720 3486.98,712.15 cw(c3478.52,720.66) 3478.52,708.66 3373.61,708.66 cw(c3373.61,720.66) 3365.15,712.15 v1(3263.74,813.56)
  B.Cu w6: TP55.1@3196.85,653.54 3196.85,681.6 ccw(c3184.85,681.6) 3193.38,690.05 3178.84,704.58 cw(c3187.35,713.05) 3175.35,713.05 3175.35,743.21 cw(c3187.35,743.21) 3178.84,751.67 R61.2@3196.85,769.69
  B.Cu w10: R61.2@3196.85,769.69 3243.74,769.69 ccw(c3243.74,789.69) 3263.74,789.69 v1(3263.74,813.56) ; v1(3263.74,813.56) 3263.76,836.69 U10.8@3263.78,860.73
TCK: J5.4 TP77.1 U18.F8 | length 1917.9
  F.Cu w6: v1@2864.87,1250.09 U18.F8@2879.84,1265.06
  F.Cu w10: U18.F8@2879.84,1265.06 U18.F8@2879.98,1265.12
  In3.Cu (Sign) w5: v1@2864.87,1250.09 2851.39,1263.57 cw(c2858.48,1270.63) 2848.48,1270.63 2848.48,1377.15 cw(c2858.48,1377.15) 2851.39,1384.2 2854.71,1387.52 cw(c2861.75,1380.42) 2861.75,1390.42 3121.11,1390.42 cw(c3121.11,1380.42) 3128.18,1387.49 3129.6,1386.07 cw(c3122.52,1379) 3132.52,1379 3132.52,1341.99 ccw(c3142.52,1341.99) 3135.42,1334.95 3170.74,1299.63 ccw(c3177.8,1306.71) 3177.8,1296.71 3274.48,1296.71 cw(c3274.48,1286.71) 3281.53,1293.8 3319.98,1255.36 cw(c3312.89,1248.3) 3322.89,1248.3 3322.89,1196.92 ccw(c3332.89,1196.92) 3325.79,1189.88 3411.16,1104.51 ccw(c3418.22,1111.59) 3418.22,1101.59 3640.3,1101.59 cw(c3640.3,1091.59) 3647.36,1098.68 3685.24,1060.8 cw(c3678.15,1053.74) 3688.15,1053.74 3688.15,890.42 ccw(c3698.15,890.42) 3691.05,883.38 3801.44,772.99 ccw(c3808.49,780.08) 3808.49,770.08 J5.4@4035.43,770.08
  B.Cu w5: TP77.1@3940.94,886.69 3940.94,868.66 ccw(c3950.94,868.71) 3943.84,861.67 J5.4@4035.43,770.08
  other v1: 2865.02,1250.09
TDI: J5.2 TP75.1 U18.T9 | length 1379.3
  F.Cu w6: v1(3179.98,1279.58) 3179.68,1279.88 3179.68,1281.36 U18.T9@3194.94,1296.62
  In3.Cu (Sign) w5: v1(3179.98,1279.58) ccw(c3188.98,1283.93) 3181.87,1276.9 3190.83,1267.94 ccw(c3197.88,1275.03) 3197.88,1265.03 3264.63,1265.03 cw(c3264.63,1255.03) 3271.68,1262.12 3295.24,1238.56 cw(c3288.15,1231.51) 3298.15,1231.51 3298.15,1180.59 ccw(c3308.15,1180.59) 3301.05,1173.55 3396.16,1078.44 ccw(c3403.21,1085.53) 3403.21,1075.53 3621.68,1075.53 cw(c3621.68,1065.53) 3628.73,1072.62 3659.52,1041.83 cw(c3652.43,1034.78) 3662.43,1034.78 3662.43,864.32 ccw(c3672.43,864.32) 3665.33,857.28 3849.62,672.99 ccw(c3856.67,680.08) 3856.67,670.08 J5.2@4035.43,670.08
  B.Cu w5: TP75.1@3940.94,713.71 3981.67,672.99 ccw(c3988.72,680.08) 3988.72,670.08 J5.2@4035.43,670.08
TDO: J5.3 TP76.1 U18.T8 | length 1365.9
  F.Cu w6: U18.T8@3194.94,1265.12 3195.82,1265.12 v1@3209.7,1279
  In3.Cu (Sign) w5: v1(3211.47,1280.57) 3268.7,1280.57 cw(c3268.7,1270.57) 3275.76,1277.66 3307.65,1245.77 cw(c3300.56,1238.71) 3310.56,1238.71 3310.56,1187.6 ccw(c3320.56,1187.6) 3313.46,1180.56 3403,1091.02 ccw(c3410.03,1098.13) 3410.03,1088.13 3631.73,1088.13 cw(c3631.73,1078.13) 3638.78,1085.22 3672.51,1051.49 cw(c3665.43,1044.43) 3675.43,1044.43 3675.43,875.23 ccw(c3685.43,875.29) 3678.32,868.25 3823.61,722.96 ccw(c3830.64,730.08) 3830.58,720.08 J5.3@4035.43,720.08
  B.Cu w5: TP76.1@3940.94,809.71 3940.94,774.2 ccw(c3950.94,774.2) 3943.84,767.16 3988.01,722.99 ccw(c3995.06,730.08) 3995.06,720.08 J5.3@4035.43,720.08
TERM_1: R1029_4_CH1.2 R1031_4_CH1.1 TP1014_4_CH1.1 U18.M14 | length 5138.7
  F.Cu w6: U18.M14@3069.09,1454.15 v1(3084.06,1469.12)
  In3.Cu (Sign) w5: v1(3084.06,1469.12) 3096.69,1481.75 ccw(c3089.6,1488.8) 3099.6,1488.8 3099.6,1565.49 cw(c3109.6,1565.49) 3102.51,1572.54 3164.73,1634.76 cw(c3171.77,1627.66) 3171.77,1637.66 3400.25,1637.66 cw(c3400.25,1627.66) 3407.27,1634.78 3412.02,1630.1 cw(c3397.99,1615.85) 3412.07,1630.05 3438.54,1603.78 ccw(c3445.6,1610.87) 3445.6,1600.87 3465.09,1600.87 ccw(c3465.09,1610.87) 3472.14,1603.78 3499.81,1631.45 cw(c3506.85,1624.35) 3506.85,1634.35 3746.94,1634.35 ccw(c3746.94,1644.35) 3753.99,1637.26 3852.11,1735.38 ccw(c3845.02,1742.44) 3855.02,1742.44 3855.02,2156.6 ccw(c3845.02,2156.6) 3852.11,2163.65 3265.72,2750.04 ccw(c3258.67,2742.95) 3258.67,2752.95 v1(3169.29,2752.95)
  B.Cu w5: R1029_4_CH1.2@864.17,3181.1 864.17,3106.5 ccw(c874.17,3106.5) 867.07,3099.47 882.9,3083.64 cw(c875.83,3076.57) 885.83,3076.57 885.83,2812.46 ccw(c895.83,2812.46) 888.72,2805.42 938.28,2755.87 ccw(c945.34,2762.95) 945.34,2752.95 v1(3169.29,2752.95)
  B.Cu w10: TP1014_4_CH1.1@812.99,3120.08 R1031_4_CH1.1@812.99,3181.1 ; R1031_4_CH1.1@812.99,3173.62 R1031_4_CH1.1@812.99,3181.1 ; R1029_4_CH1.2@864.17,3181.1 R1031_4_CH1.1@812.99,3181.1
TERM_1M_CH1: K1000_4_CH1.2 R1022_4_CH1.2 | length 261.3
  F.Cu w8.39: K1000_4_CH1.2@632.29,3192.55 651.85,3212.11 668.11,3212.11 710.63,3254.63 R1022_4_CH1.2@710.63,3411.91
TERM_1M_CH2: K1000_4_CH2.2 R1022_4_CH2.2 | length 260
  F.Cu w8.39: K1000_4_CH2.2@628,2399 634.02,2405.02 668.02,2405.02 710.63,2447.63 R1022_4_CH2.2@710.63,2604.82
TERM_1M_CH3: K1000_4_CH3.2 R1022_4_CH3.2 | length 292.3
  F.Cu w8.39: K1000_4_CH3.2@633.86,1586.38 692.19,1586.38 710.63,1604.82 R1022_4_CH3.2@710.63,1812.72
TERM_1M_CH4: K1000_4_CH4.2 R1022_4_CH4.2 | length 270.5
  F.Cu w8.39: K1000_4_CH4.2@620.61,774.84 650.28,774.84 710.63,835.19 R1022_4_CH4.2@710.63,990.65
TERM_1M_R_CH1: C1022_4_CH1.2 K1000_4_CH1.7 R1022_4_CH1.1 | length 298.4
  F.Cu w8.39: R1022_4_CH1.1@773.62,3426.4 C1022_4_CH1.2@833.51,3426.4 ; C1022_4_CH1.2@832.68,3412.89 832.68,3240.71 876.14,3197.25 K1000_4_CH1.7@881,3197.25
TERM_1M_R_CH2: C1022_4_CH2.2 K1000_4_CH2.7 R1022_4_CH2.1 | length 323
  F.Cu w8.39: R1022_4_CH2.1@773.62,2619.8 C1022_4_CH2.2@834,2619.8 ; C1022_4_CH2.2@832.68,2605.81 832.68,2434.25 861.28,2405.64 861.28,2405.02 865.73,2400.57 888.03,2400.57 K1000_4_CH2.7@903.13,2385.46
TERM_1M_R_CH3: C1022_4_CH3.2 K1000_4_CH3.7 R1022_4_CH3.1 | length 323.7
  F.Cu w8.39: R1022_4_CH3.1@773.62,1812.72 C1022_4_CH3.2@834,1812.72 ; C1022_4_CH3.2@832.68,1798.72 832.68,1626.32 861.07,1597.93 884.23,1597.93 K1000_4_CH3.7@903.78,1578.38
TERM_1M_R_CH4: C1022_4_CH4.2 K1000_4_CH4.7 R1022_4_CH4.1 | length 313.3
  F.Cu w8.39: R1022_4_CH4.1@773.62,1005.65 C1022_4_CH4.2@834,1005.65 ; C1022_4_CH4.2@832.68,991.63 832.68,819.45 880.83,771.29 K1000_4_CH4.7@893.43,771.29
TERM_2: R1029_4_CH2.2 R1031_4_CH2.1 TP1014_4_CH2.1 U18.K15 | length 5167.4
  F.Cu w5: U18.K15@3005.96,1485.59 3020.33,1499.96 v1(3020.92,1499.96)
  In3.Cu (Sign) w5: v1(3020.92,1499.96) cw(c3027.13,1507.8) 3020.1,1500.68 3008.42,1512.36 cw(c3015.53,1519.4) 3005.53,1519.4 3005.53,1568.99 ccw(c2995.53,1568.99) 3002.6,1576.06 2990.8,1587.86 cw(c2997.91,1594.89) 2987.91,1594.89 2987.91,1625.91 cw(c2997.91,1625.91) 2990.82,1632.96 3057.77,1699.91 cw(c3064.81,1692.81) 3064.81,1702.81 3723.52,1702.81 ccw(c3723.52,1712.81) 3730.58,1705.72 3784.83,1759.98 ccw(c3777.75,1767.04) 3787.75,1767.04 3787.75,2080.89 ccw(c3777.75,2080.89) 3784.83,2087.96 3281.22,2591.57 ccw(c3274.15,2584.49) 3274.15,2594.49 v1(3169.29,2594.49)
  B.Cu w5: R1029_4_CH2.2@864.17,2374.02 864.17,2299.42 ccw(c874.17,2299.42) 867.07,2292.38 882.9,2276.55 cw(c875.83,2269.48) 885.83,2269.48 885.83,2115.36 ccw(c895.83,2115.36) 888.71,2108.34 970.51,2026.54 ccw(c977.57,2033.62) 977.57,2023.62 1740.48,2023.62 ccw(c1740.48,2033.62) 1747.54,2026.54 1964.5,2243.5 cw(c1971.54,2236.4) 1971.54,2246.4 2017.85,2246.4 ccw(c2017.85,2256.4) 2024.9,2249.31 2117.34,2341.75 ccw(c2110.26,2348.81) 2120.26,2348.81 2120.26,2450.81 cw(c2130.26,2450.81) 2123.17,2457.87 2232.09,2566.79 cw(c2239.13,2559.68) 2239.13,2569.68 3140.35,2569.69 ccw(c3140.35,2579.69) 3147.4,2572.6 v1(3169.29,2594.49)
  B.Cu w10: TP1014_4_CH2.1@812.99,2312.99 R1031_4_CH2.1@812.99,2374.02 R1029_4_CH2.2@864.17,2374.02
TERM_3: R1029_4_CH3.2 R1031_4_CH3.1 TP1014_4_CH3.1 U18.K17 | length 3381.4
  F.Cu w6: U18.K17@3006.1,1548.64 3019.04,1561.58 ccw(c3010.53,1570.04) 3022.52,1569.75 v1(3023.41,1605.92)
  B.Cu w5: R1029_4_CH3.2@864.17,1566.93 864.17,1492.33 ccw(c874.17,1492.33) 867.07,1485.3 882.9,1469.46 cw(c875.83,1462.39) 885.83,1462.39 885.83,1198.29 ccw(c895.83,1198.29) 888.71,1191.26 939.27,1140.71 ccw(c946.32,1147.8) 946.32,1137.8 1870.86,1137.8 ccw(c1870.86,1147.8) 1877.91,1140.71 2143.53,1406.32 ccw(c2136.44,1413.38) 2146.44,1413.38 2146.44,1621.63 cw(c2156.44,1621.63) 2149.37,1628.7 2427.19,1906.52 cw(c2434.26,1899.45) 2434.26,1909.45 2878.73,1909.45 cw(c2878.73,1899.45) 2885.8,1906.52 2981.57,1810.75 cw(c2974.5,1803.68) 2984.5,1803.68 2984.5,1648.97 ccw(c2994.5,1648.97) 2987.39,1641.94 v1(3023.41,1605.92)
  B.Cu w10: TP1014_4_CH3.1@812.99,1505.91 R1031_4_CH3.1@812.99,1566.93 R1029_4_CH3.2@864.17,1566.93
TERM_4: R1029_4_CH4.2 R1031_4_CH4.1 TP1014_4_CH4.1 U18.V13 | length 3682.8
  F.Cu w6: U18.V13@3257.99,1422.47 3274.97,1422.47 cw(c3274.97,1410.47) 3283.44,1418.97 v1(3296.06,1406.35)
  B.Cu w5: R1029_4_CH4.2@864.17,759.84 864.17,685.24 ccw(c874.17,685.24) 867.07,678.21 882.9,662.38 cw(c875.83,655.31) 885.83,655.31 885.83,502.17 ccw(c895.83,502.17) 888.71,495.15 971.5,412.36 ccw(c978.55,419.45) 978.55,409.45 1700.39,409.45 ccw(c1700.39,419.45) 1707.46,412.38 1754.17,459.1 ccw(c1747.09,466.15) 1757.09,466.15 1757.09,591.04 cw(c1767.09,591.04) 1760,598.09 1854.05,692.14 cw(c1861.09,685.03) 1861.09,695.03 2028.15,695.03 ccw(c2028.15,705.03) 2035.2,697.95 2087.25,749.99 ccw(c2080.16,757.05) 2090.16,757.05 2090.16,875.35 cw(c2100.16,875.35) 2093.07,882.4 2133.77,923.1 cw(c2140.81,916) 2140.81,926 2390.38,926 ccw(c2390.38,936) 2397.43,928.91 ; 2397.44,928.91 2419.36,950.84 cw(c2426.4,943.74) 2426.4,953.74 2947.27,953.74 ccw(c2947.27,963.74) 2954.32,956.65 2975.09,977.42 cw(c2982.13,970.31) 2982.13,980.31 3273,980.31 ccw(c3273,990.31) 3280.05,983.23 3309.14,1012.32 ccw(c3302.05,1019.37) 3312.05,1019.37 3312.05,1386.21 ccw(c3302.05,1386.21) 3309.13,1393.28 v1(3296.06,1406.35)
  B.Cu w10: TP1014_4_CH4.1@812.99,698.82 R1031_4_CH4.1@812.99,759.84 819.8,759.84 R1029_4_CH4.2@864.17,759.84
TERM_50Z_CH1: C1058_4_CH1.2 K1000_4_CH1.4 R1021_4_CH1.2 R1025_4_CH1.2 | length 339.4
  F.Cu w20: K1000_4_CH1.4@633.86,3027.32 639.61,3021.57 664.58,3021.57 739.74,2946.41 740.4,2946.41 752.06,2934.76 R1025_4_CH1.2@752.06,2909.11 ; C1058_4_CH1.2@803.06,2920.77 763.71,2920.77 R1025_4_CH1.2@752.06,2909.11 ; R1021_4_CH1.2@826.09,2871.56 769.42,2871.56 752.06,2888.92 R1025_4_CH1.2@752.06,2903.27 R1025_4_CH1.2@752.06,2909.11
TERM_50Z_CH2: C1058_4_CH2.2 K1000_4_CH2.4 R1021_4_CH2.2 R1025_4_CH2.2 | length 339.4
  F.Cu w20: K1000_4_CH2.4@633.86,2220.24 639.61,2214.48 664.58,2214.48 739.74,2139.32 740.4,2139.32 752.06,2127.67 R1025_4_CH2.2@752.06,2102.03 ; C1058_4_CH2.2@803.06,2113.68 763.71,2113.68 R1025_4_CH2.2@752.06,2102.03 ; R1021_4_CH2.2@826.09,2064.47 769.42,2064.47 752.06,2081.84 R1025_4_CH2.2@752.06,2096.18 R1025_4_CH2.2@752.06,2102.03
TERM_50Z_CH3: C1058_4_CH3.2 K1000_4_CH3.4 R1021_4_CH3.2 R1025_4_CH3.2 | length 339.4
  F.Cu w20: K1000_4_CH3.4@633.86,1413.15 639.61,1407.4 664.58,1407.4 739.74,1332.24 740.4,1332.24 752.06,1320.58 R1025_4_CH3.2@752.06,1294.94 ; C1058_4_CH3.2@803.06,1306.59 763.71,1306.59 R1025_4_CH3.2@752.06,1294.94 ; R1021_4_CH3.2@826.09,1257.38 769.42,1257.38 752.06,1274.75 R1025_4_CH3.2@752.06,1289.09 R1025_4_CH3.2@752.06,1294.94
TERM_50Z_CH4: C1058_4_CH4.2 K1000_4_CH4.4 R1021_4_CH4.2 R1025_4_CH4.2 | length 339.4
  F.Cu w20: K1000_4_CH4.4@633.86,606.06 639.61,600.31 664.58,600.31 739.74,525.15 740.4,525.15 752.06,513.5 R1025_4_CH4.2@752.06,487.85 ; C1058_4_CH4.2@803.06,499.51 763.71,499.51 R1025_4_CH4.2@752.06,487.85 ; R1021_4_CH4.2@826.09,450.3 769.42,450.3 752.06,467.66 R1025_4_CH4.2@752.06,482 R1025_4_CH4.2@752.06,487.85
TERM_50Z_R_CH1: K1000_4_CH1.5 R1021_4_CH1.1 R1053_4_CH1.2 | length 173.2
  F.Cu w8.39: R1021_4_CH1.1@889.08,2871.56 890.56,2873.04 890.56,2898.91 905.08,2913.43 905.08,2914.48 912.53,2921.93 912.53,2941.23 893.63,2960.13 K1000_4_CH1.5@893.7,3027.32
TERM_50Z_R_CH2: K1000_4_CH2.5 R1021_4_CH2.1 R1053_4_CH2.2 | length 173.2
  F.Cu w8.39: R1021_4_CH2.1@889.08,2064.47 890.56,2065.96 890.56,2091.82 905.08,2106.34 905.08,2107.39 912.53,2114.84 912.53,2134.15 893.63,2153.05 K1000_4_CH2.5@893.7,2220.24
TERM_50Z_R_CH3: K1000_4_CH3.5 R1021_4_CH3.1 R1053_4_CH3.2 | length 173.2
  F.Cu w8.39: R1021_4_CH3.1@889.08,1257.38 890.56,1258.87 890.56,1284.74 905.08,1299.26 905.08,1300.3 912.53,1307.75 912.53,1327.06 893.63,1345.96 K1000_4_CH3.5@893.63,1413.08
TERM_50Z_R_CH4: K1000_4_CH4.5 R1021_4_CH4.1 R1053_4_CH4.2 | length 173.2
  F.Cu w8.39: R1021_4_CH4.1@889.08,450.3 890.56,451.78 890.56,477.65 905.08,492.17 905.08,493.21 912.53,500.66 912.53,519.97 893.63,538.87 K1000_4_CH4.5@893.63,605.99
TEST: R53.2 U7.21 | length 64.3
  F.Cu w6: U7.21@3346.46,2198.82 v1(3375.98,2198.82)
  B.Cu w6: v1(3375.98,2198.82) 3379.92,2198.82 3399.61,2179.13 R53.2@3400.59,2179.13
  B.Cu w8: v1(3375.98,2198.82) v1@3377.95,2198.82
TMS: J5.1 TP78.1 U18.R8 | length 1364.7
  F.Cu w6: U18.R8@3163.44,1265.12 3175.21,1253.36 ccw(c3183.67,1261.86) 3183.31,1249.87 v1(3210.29,1249.08)
  In3.Cu (Sign) w5: v1(3210.29,1249.08) 3210.37,1249.04 cw(c3205.94,1240.07) 3213.01,1247.14 3228.71,1231.44 ccw(c3235.77,1238.53) 3235.77,1228.53 3267.59,1228.53 cw(c3267.59,1218.53) 3274.64,1225.62 3282.11,1218.15 cw(c3275.02,1211.1) 3285.02,1211.1 3285.02,1174.72 ccw(c3295.02,1174.72) 3287.92,1167.67 3391.2,1064.39 ccw(c3398.23,1071.51) 3398.23,1061.51 3615.5,1061.51 cw(c3615.5,1051.51) 3622.55,1058.59 3642.46,1038.69 cw(c3635.37,1031.63) 3645.37,1031.64 3645.37,854.02 ccw(c3655.37,854.02) 3648.27,846.98 3872.28,622.97 ccw(c3879.31,630.08) 3879.31,620.08 J5.1@4035.43,620.08
  B.Cu w5: TP78.1@3940.94,618.11 4033.46,618.11 J5.1@4035.43,620.08
TRIM_1: C1041_4_CH1.2 FB1001_4_CH1.1 U2.14 | length 1134.1
  F.Cu w6: v1@2354.13,3210.43 v1(2354.13,3210.63) U2.14@2354.13,3251.97
  In3.Cu (Sign) w8: v1(1763.78,3236.22) 1748.72,3251.28 cw(c1760.09,3262.53) 1744.09,3262.53 1744.09,3356.56 cw(c1760.09,3356.56) 1748.77,3367.85 1788.39,3407.48 cw(c1799.69,3396.15) 1799.69,3412.15 1890.07,3412.15 ccw(c1890.07,3428.15) 1901.37,3416.82 1939.09,3454.55 cw(c1950.39,3443.22) 1950.39,3459.22 2109.06,3459.22 cw(c2109.06,3443.22) 2120.36,3454.55 2229.71,3345.19 ccw(c2240.98,3356.55) 2240.98,3340.55 2293.46,3340.55 cw(c2293.46,3324.55) 2304.76,3335.88 2349.46,3291.17 cw(c2338.13,3279.87) 2354.13,3279.87 v1(2354.13,3210.63)
  B.Cu w10: C1041_4_CH1.2@1694.39,3254.82 1694.39,3291.83 FB1001_4_CH1.1@1694.88,3292.32 ; C1041_4_CH1.2@1695.47,3251.97 1695.47,3210.04 1704.72,3200.79 1728.35,3200.79 v1(1763.78,3236.22)
TRIM_2: C1041_4_CH2.2 FB1001_4_CH2.1 U2.9 | length 1699.7
  F.Cu w6: v1@2226.18,3210.43 U2.9@2226.18,3251.97
  In3.Cu (Sign) w8: v1(1763.78,2429.13) ccw(c1753.73,2441.59) 1765.02,2430.25 1777.81,2443.03 ccw(c1766.48,2454.33) 1782.48,2454.33 1782.48,3356.07 cw(c1798.48,3356.07) 1787.15,3367.37 1797.64,3377.85 cw(c1808.94,3366.53) 1808.94,3382.53 2100.02,3382.53 cw(c2100.02,3366.53) 2111.33,3377.84 2221.49,3267.68 cw(c2210.18,3256.36) 2226.18,3256.36 v1(2226.18,3210.63)
  B.Cu w10: C1041_4_CH2.2@1694.39,2447.74 1694.39,2484.74 FB1001_4_CH2.1@1694.88,2485.24 ; C1041_4_CH2.2@1695.47,2444.88 1695.47,2402.95 1704.72,2393.7 1728.35,2393.7 v1(1763.78,2429.13)
TRIM_3: C1041_4_CH3.2 FB1001_4_CH3.1 U2.8 | length 2422.2
  F.Cu w6: v1@2200.59,3210.43 U2.8@2200.59,3251.97
  In3.Cu (Sign) w8: v1(1763.78,1622.05) ccw(c1753.73,1634.5) 1765.05,1623.19 1799.46,1657.6 ccw(c1788.13,1668.9) 1804.13,1668.9 1804.13,2044.07 1804.13,2044.36 1804.13,3348.69 cw(c1820.13,3348.69) 1808.81,3359.99 1812.26,3363.44 cw(c1823.56,3352.11) 1823.56,3368.11 2036.48,3368.11 cw(c2036.48,3352.11) 2047.8,3363.42 v1(2200.59,3210.63)
  B.Cu w10: C1041_4_CH3.2@1694.39,1640.65 1694.39,1677.66 FB1001_4_CH3.1@1694.88,1678.15 ; C1041_4_CH3.2@1695.47,1637.8 1695.47,1595.87 1704.72,1586.61 1728.35,1586.61 v1(1763.78,1622.05)
TRIM_4: C1041_4_CH4.2 FB1001_4_CH4.1 U2.1 | length 3454.7
  F.Cu w6: v1(2354.13,3442.91) U2.1@2354.13,3484.25
  In3.Cu (Sign) w8: v1(1763.78,814.96) 1744.81,833.93 cw(c1756.16,845.21) 1740.16,845.21 1740.16,3224.87 ccw(c1724.16,3224.87) 1735.47,3236.18 1729.06,3242.59 cw(c1740.41,3253.87) 1724.41,3253.87 1724.41,3358.11 cw(c1740.41,3358.11) 1729.08,3369.41 1786.72,3427.05 cw(c1798.02,3415.72) 1798.02,3431.72 1889.66,3431.72 ccw(c1889.66,3447.72) 1900.96,3436.4 1932.11,3467.55 cw(c1943.41,3456.22) 1943.41,3472.22 2318.2,3472.22 cw(c2318.2,3456.22) 2329.51,3467.53 v1(2354.13,3442.91)
  B.Cu w10: C1041_4_CH4.2@1694.39,833.56 1694.39,870.57 FB1001_4_CH4.1@1694.88,871.06 ; C1041_4_CH4.2@1695.47,830.71 1695.47,788.78 1704.72,779.53 1728.35,779.53 v1(1763.78,814.96)
TRIM_SCL: Q1.3 R9.1 TP59.1 U18.T13 | length 4578.2
  F.Cu w6: U18.T13@3195.07,1422.66 3210.04,1437.63 v1(3210.04,1438.05)
  B.Cu w5: R9.1@2517.72,3376.97 2526.57,3381.5 2940.74,3381.5 ccw(c2940.74,3391.5) 2947.81,3384.42 2974.22,3410.83 ccw(c2967.17,3417.92) 2977.17,3417.92 2977.17,3483.65 cw(c2987.17,3483.65) 2980.08,3490.71 3023.87,3534.5 cw(c3030.91,3527.4) 3030.91,3537.4 3490.94,3537.4 cw(c3490.94,3527.4) 3497.99,3534.49 3649.65,3382.83 cw(c3642.56,3375.78) 3652.56,3375.78 3652.56,3318.64 ccw(c3662.56,3318.64) 3655.47,3311.59 3766.78,3200.28 cw(c3759.68,3193.23) 3769.68,3193.23 3769.68,2873.83 cw(c3759.68,2873.83) 3766.77,2866.77 3732.91,2832.91 ccw(c3740,2825.86) 3730,2825.86 3730,2552.88 ccw(c3740,2552.88) 3732.9,2545.84 3765.29,2513.44 ccw(c3772.32,2520.56) 3772.32,2510.56 3870.93,2510.56 cw(c3870.93,2500.56) 3877.98,2507.64 4034.16,2351.46 cw(c4027.08,2344.41) 4037.08,2344.41 4037.08,1520.41 cw(c4027.08,1520.41) 4034.16,1513.35 3970.96,1450.15 cw(c3963.91,1457.24) 3963.91,1447.24 3661.38,1447.24 ccw(c3661.38,1437.24) 3654.34,1444.34 3582.1,1372.1 cw(c3575.04,1379.19) 3575.04,1369.19 3359.36,1369.19 cw(c3359.36,1379.19) 3352.31,1372.1 3304.11,1420.3 ccw(c3297.04,1413.23) 3297.04,1423.23 3229.01,1423.23 cw(c3229.01,1433.23) 3221.96,1426.14 v1(3210.04,1438.05)
  B.Cu w6: Q1.3@2475.39,3375 R9.1@2514.76,3375
  B.Cu w10: Q1.3@2475.39,3376.97 2471.14,3381.22 2452.68,3399.69 cw(c2466.85,3413.8) 2446.85,3413.8 2446.85,3438.57 cw(c2466.85,3438.57) 2452.71,3452.71 2466.62,3466.62 cw(c2480.72,3452.44) 2480.72,3472.44 TP59.1@2539.37,3472.44
TRIM_SCL_5V: Q1.1 R11.1 TP6.1 U2.4 U3.2 | length 439.7
  F.Cu w6: v1(2277.36,3442.91) U2.4@2277.36,3484.25 ; U3.2@2445.67,3251.97 2445.67,3293.31 2445.87,3293.5 v1(2445.87,3319.88)
  B.Cu w6: v1@2277.36,3443.7 v1(2277.36,3442.91) 2317.72,3402.56 R11.1@2358.27,3402.56 Q1.1@2400.59,3402.56 2400.59,3344.49 2425.2,3319.88 v1(2445.87,3319.88)
  B.Cu w10: v1(2277.36,3442.91) 2277.36,3473.23 TP6.1@2304.13,3500 TP6.1@2304.13,3492.13
TRIM_SDA: Q2.3 R10.1 TP60.1 U18.V14 | length 4393.9
  F.Cu w10: U18.V14@3259.5,1454.2 v1(3274.47,1439.23)
  B.Cu w5: R10.1@2520.26,3268.13 2554.27,3268.13 cw(c2554.27,3258.13) 2554.44,3268.13 2563.7,3267.97 ccw(c2563.98,3283.46) 2563.98,3267.96 2878.94,3267.96 ccw(c2878.94,3283.46) 2879.07,3267.97 2897.86,3268.13 ccw(c2897.77,3278.13) 2904.82,3271.04 3014.41,3380.63 ccw(c3007.32,3387.69) 3017.32,3387.69 3017.32,3486.8 cw(c3027.32,3486.8) 3020.24,3493.86 3049.07,3522.69 cw(c3056.11,3515.59) 3056.11,3525.59 3219.87,3525.59 cw(c3219.87,3515.59) 3226.93,3522.68 3242.78,3506.83 ccw(c3249.81,3513.94) 3249.81,3503.94 3480.9,3503.94 cw(c3480.9,3493.94) 3487.95,3501.02 3603.39,3385.59 cw(c3596.3,3378.54) 3606.3,3378.54 3606.3,3335.84 ccw(c3616.3,3335.84) 3609.2,3328.79 3745.64,3192.35 cw(c3738.55,3185.3) 3748.55,3185.3 3748.55,2872.69 cw(c3738.55,2872.69) 3745.64,2865.64 3713.72,2833.72 ccw(c3720.81,2826.67) 3710.81,2826.67 3710.81,2537.43 ccw(c3720.81,2537.43) 3713.71,2530.39 3746.53,2497.57 ccw(c3753.55,2504.69) 3753.55,2494.69 3864.78,2494.69 cw(c3864.78,2484.69) 3871.83,2491.77 4019.14,2344.47 cw(c4012.05,2337.41) 4022.05,2337.41 4022.05,1525.71 cw(c4012.05,1525.71) 4019.14,1518.66 3963.92,1463.44 cw(c3956.86,1470.52) 3956.86,1460.52 3616.67,1460.52 ccw(c3616.67,1450.52) 3609.63,1457.63 3557.57,1405.56 cw(c3550.51,1412.65) 3550.51,1402.65 3528.84,1402.65 ccw(c3528.84,1392.65) 3521.8,1399.75 3506.85,1384.8 cw(c3499.79,1391.89) 3499.79,1381.89 3370.28,1381.89 cw(c3370.28,1391.89) 3363.23,1384.8 3311.7,1436.33 ccw(c3304.65,1429.23) 3304.65,1439.23 v1(3274.47,1439.23)
  B.Cu w6: Q2.3@2475.39,3268.7 2508.91,3268.7 R10.1@2514.76,3268.7
  B.Cu w10: R10.1@2520.26,3268.13 2517.72,3263.86 2517.72,3248.13 ccw(c2537.72,3248.13) 2521.57,3236.33 TP60.1@2540.35,3210.63
TRIM_SDA_5V: Q2.1 R12.1 TP7.1 U2.5 U3.3 | length 493.7
  F.Cu w6: v1@2251.77,3442.72 U2.5@2251.77,3484.25 ; v1@2464.57,3294.29 2464.57,3294.09 2465.35,3293.31 U3.3@2465.35,3251.97
  B.Cu w6: v1@2251.77,3443.11 v1(2251.77,3442.91) 2251.77,3403.74 2311.02,3344.49 2311.02,3308.07 2324.8,3294.29 2385.83,3294.29 ; Q2.1@2400.59,3294.29 2385.83,3294.29 ; v1@2464.57,3294.29 2385.83,3294.29
  B.Cu w10: TP7.1@2225.39,3492.13 TP7.1@2225.39,3500 2251.77,3473.62 v1(2251.77,3442.91)
  other v1: 2465.55,3294.29
U5-: C4.1 R13.1 R13.3 U5.4 | length 257.4
  F.Cu w6: R13.1@2652.36,3222.64 2662.99,3213.19 2670.38,3206.62 ccw(c2678.36,3215.59) 2673.8,3204.49 2696.85,3195.08 R13.3@2707.48,3185.63 2739.37,3185.63 C4.1@2748.82,3186.02 C4.1@2758.27,3195.28 ; C4.1@2758.29,3195.3 2828.5,3265.51 ccw(c2819.99,3273.97) 2831.99,3273.97 U5.4@2831.99,3300.79